# Altium PCB PCB1.pcbdoc
Units mil, origin at the board's own origin, x right, y up, seen from the top; angles counter-clockwise.
Board outline 2288.65 x 3343.6 mil, 2 copper layers (Top Layer, Bottom Layer); 10 components, 5 nets, 25 pads, 0 vias.
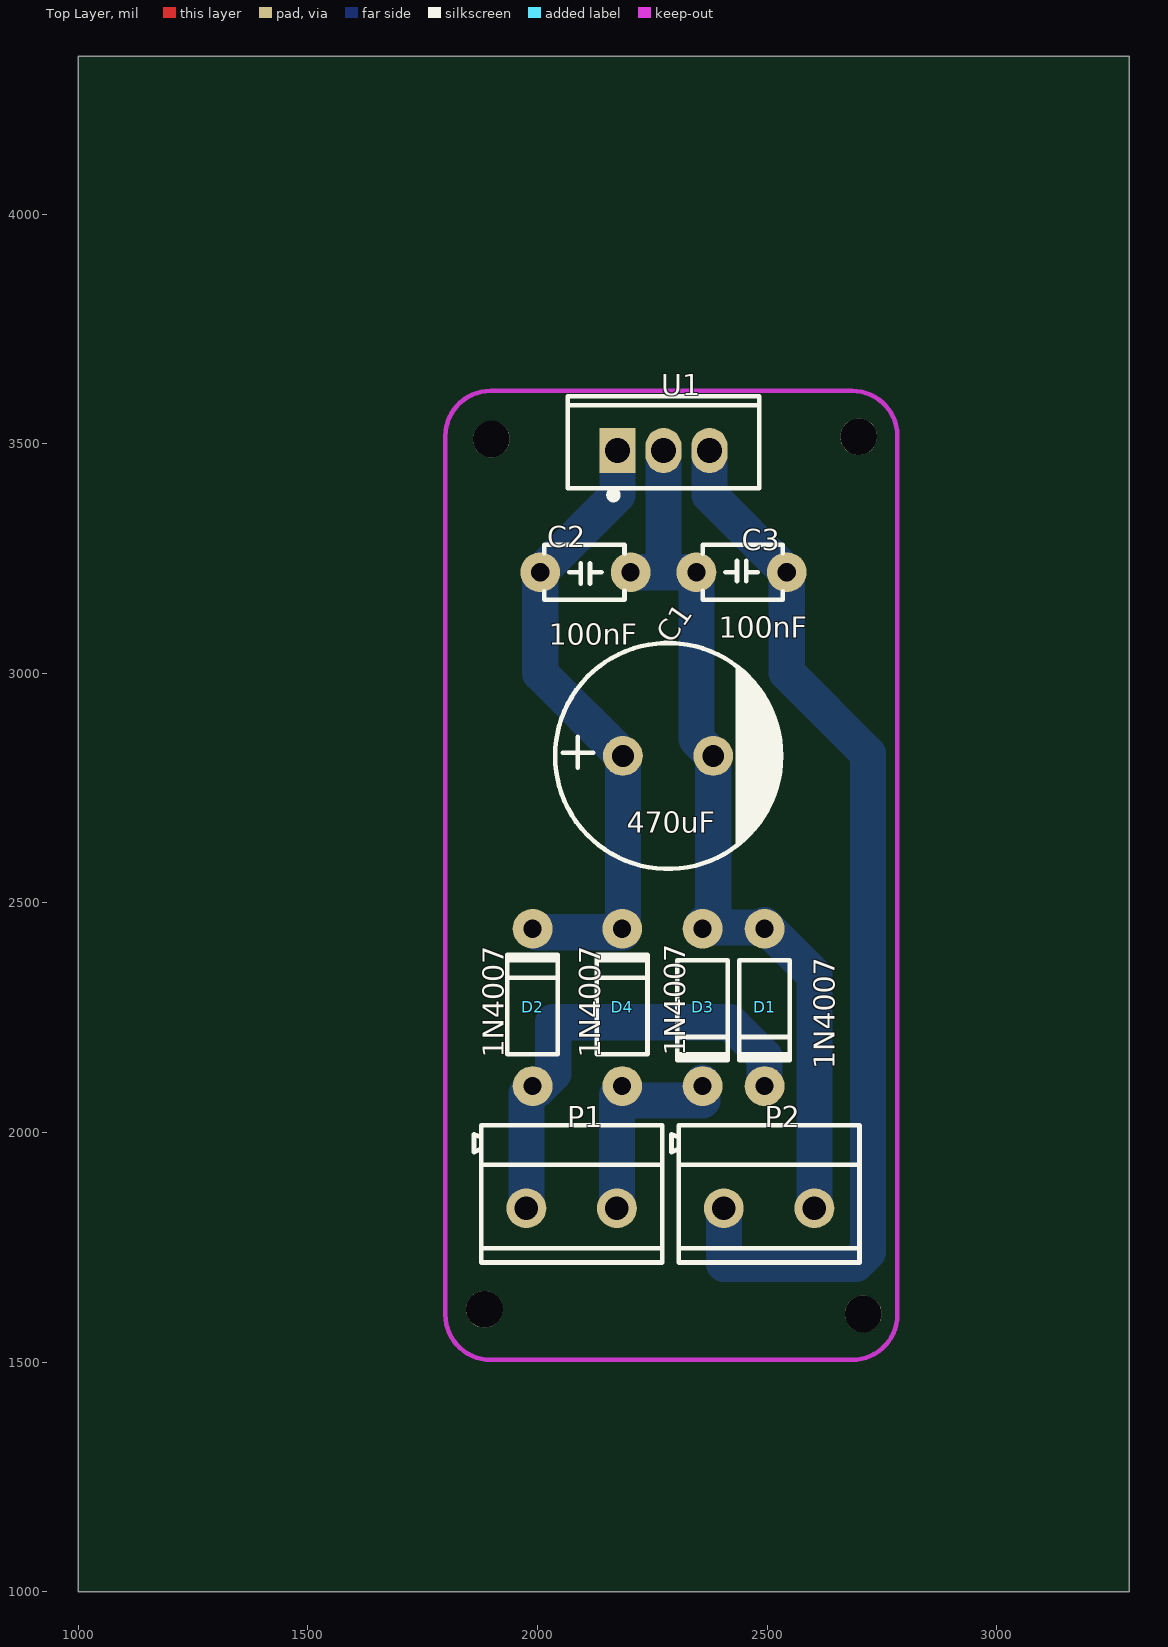
[diagram p0: Top Layer view]
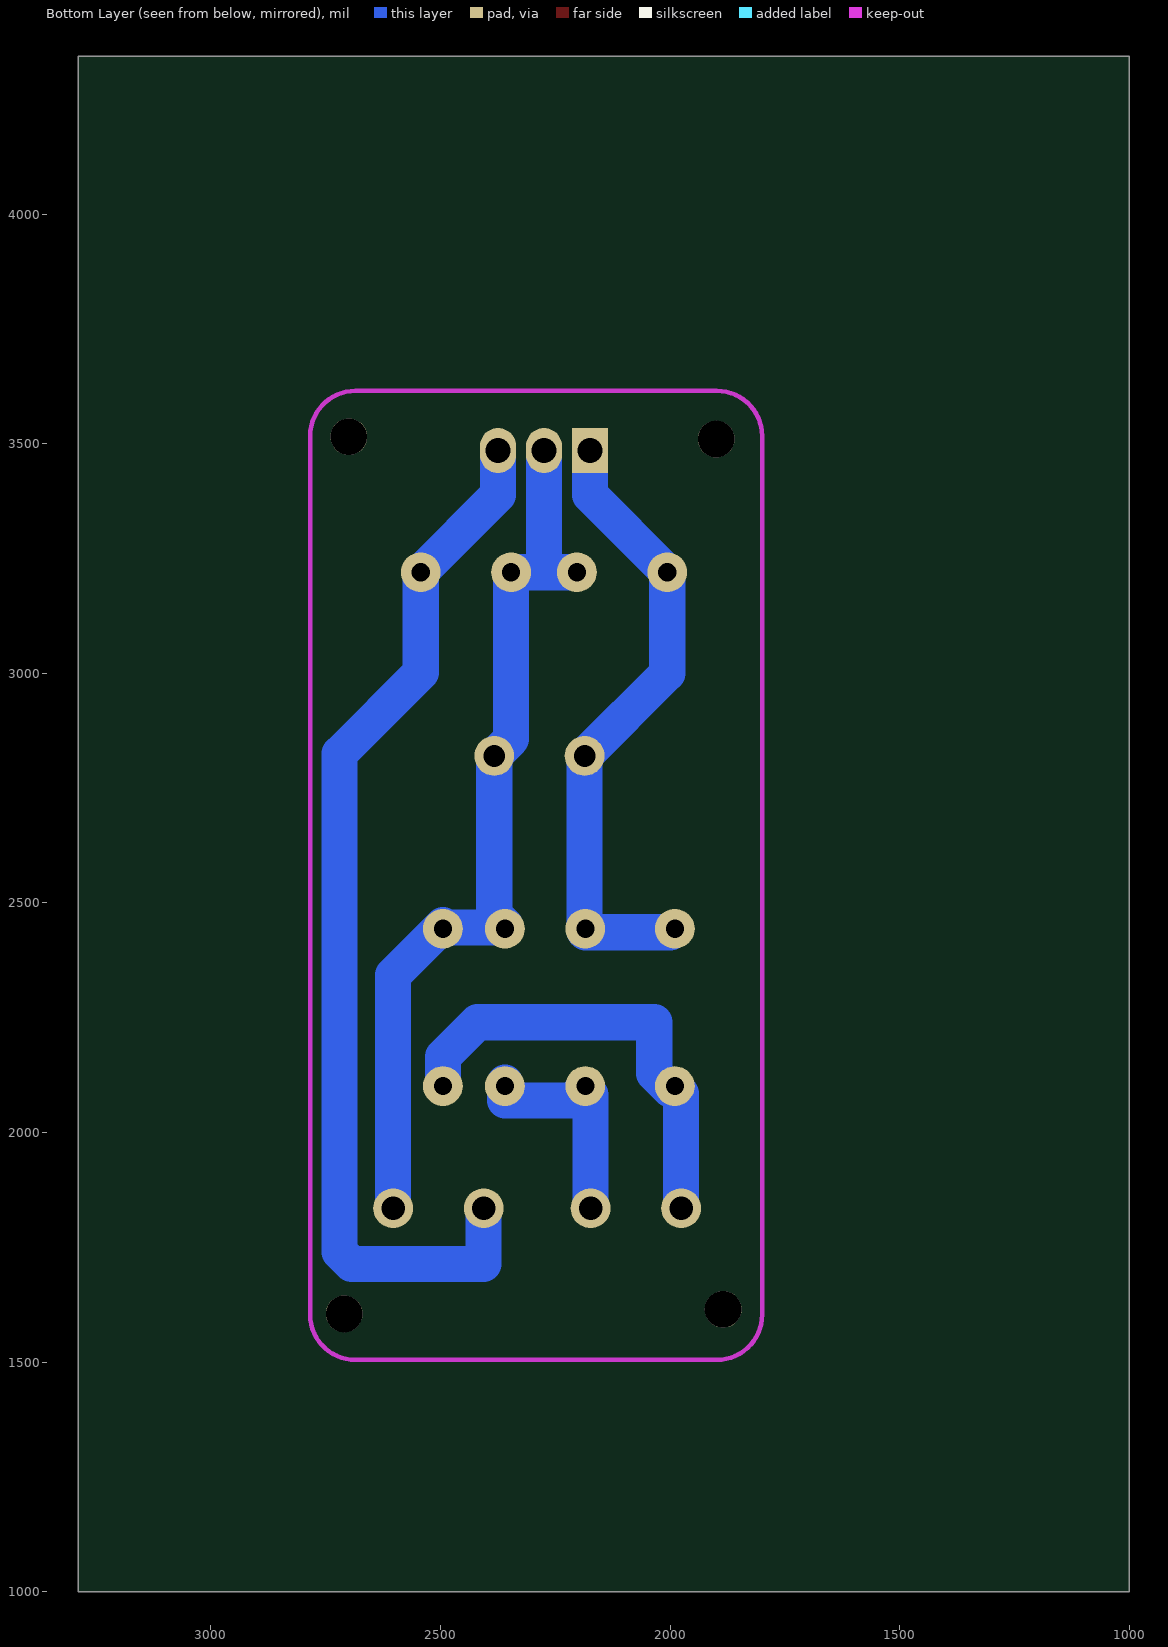
[diagram p1: Bottom Layer view, seen from below]

## Layer stack, top to bottom
Top Solder: solder mask 0.4, Solder Resist, Dk 3.5
Top Layer: signal copper 1.4
Dielectric1: dielectric 12.6, FR-4, Dk 4.8
Bottom Layer: signal copper 1.4
Bottom Solder: solder mask 0.4, Solder Resist, Dk 3.5

## Board outline
3288.65,1000 1000,1000 1000,4343.6 3288.65,4343.6

## Design rules (kind name [scope] priority, off if disabled: settings)
Clearance [All] p1: gap=10 ignorepadtopadclearanceinfootprint=FALSE
PolygonConnect [All] p1: connectstyle=Relief reliefconductorwidth=10 reliefentries=4 polygonreliefangle="90 Angle" airgapwidth=10
RoutingVias [All] p1: holewidth=28 width=50 viastyle="Through Hole" minholewidth=28 minwidth=50 maxholewidth=28 maxwidth=50
SolderMaskExpansion [All] p1: expansion=0 istentingtop=FALSE
Width [All] p1: maxlimit=10 minlimit=10 preferedwidth=10
30 further rules are at their usual default settings.

## Components (designator, comment, footprint, x,y, rotation, side; value= is the part's Value field where it differs from the comment)
C1 "470uF" CAP-TH_BD12.5-P5.00-D0.6-FD 2284.44,2820 r0 top
C2 "100nF" CAP-TH_L4.5-W3.0-P5.00-D0.5 2104.44,3220 r180 top
C3 "100nF" CAP-TH_L4.5-W3.0-P5.00-D0.5 2444.44,3220 r0 top
D1 "1N4007" DO-41_BD2.4-L4.7-P8.70-D0.6-RD 2494.44,2272.5 r90 top
D2 "1N4007" DO-41_BD2.4-L4.7-P8.70-D0.6-RD 1989.44,2272.5 r270 top
D3 "1N4007" DO-41_BD2.4-L4.7-P8.70-D0.6-RD 2359.44,2272.5 r90 top
D4 "1N4007" DO-41_BD2.4-L4.7-P8.70-D0.6-RD 2184.44,2272.5 r270 top
P1 "AC input" CONN-TH_2P-P5.00 2074.44,1835 r0 top
P2 "5v out" CONN-TH_2P-P5.00 2504.44,1835 r0 top
U1 "LM7805L-TF3-T" TO-220F-3_L10.2-W4.9-P2.54-L 2274.44,3485 r0 top

## Footprints (in the part's own frame and the unit in brackets; to place one, negate y for a bottom-side part, rotate by r counter-clockwise, add the part's x,y. Pads: shape width x height; smd on the part's side, far side on the other; paste and mask are expansions set on the pad)
CAP-TH_BD12.5-P5.00-D0.6-FD [mm]
  round 2.2 hole 1.2 paste-2539.97 mask+0.05: 1(-2.5,0) 2(2.5,0)
  silkscreen extent -6.25,-6.25 6.25,6.25
CAP-TH_L4.5-W3.0-P5.00-D0.5 [mm]
  round 2.2 hole 1 paste-2539.97 mask+0.05: 1(-2.5,0) 2(2.5,0)
  silkscreen extent -2.16,-1.52 2.29,1.52
CONN-TH_2P-P5.00 [mm]
  round 2.2 hole 1.3 paste-2539.97 mask+0.051: 1(-2.504,0) 2(2.504,0)
  silkscreen extent -5.4,-3 5,4.6
DO-41_BD2.4-L4.7-P8.70-D0.6-RD [mm]
  round 2.2 hole 1 paste-2539.97 mask+0.051: 1(-4.35,0) 2(4.35,0)
  silkscreen extent -2.92,-1.4 2.6,1.4
TO-220F-3_L10.2-W4.9-P2.54-L [mm]
  rect 2x2.5 hole 1.4 paste-2539.97 mask+0.051: 1(-2.54,0)
  oval 2x2.5 hole 1.4 paste-2539.97 mask+0.051: 2(0,0) 3(2.54,0)
  silkscreen extent -5.3,-2.66 5.3,3

## Free pads (board coordinates)
  round 80 hole 80 unplated paste-99999: ""(1884.44,1615) ""(1899.44,3510) ""(2699.44,3515) ""(2709.44,1605)

## Nets (pads, with @x,y where several pads share a name; then routed paths per layer and width w, separated by ;. In a path a pad name is that pad's centre, name@x,y a point inside that pad or via, vN(x,y) a via of type N, cw(c..) or ccw(c..) an arc to the next point about the centre after c; other vN are vias at no path point)
D1_1: D1.1 D2.2 P1.1 | length 977.5
  Bottom Layer w78.74: P1.1 1975.85,2085.14 D2.2@1989.44,2098.74 ; D2.2@1999.44,2093.74 2034.44,2128.74 2034.44,2240 2419.44,2240 2494.44,2165 D1.1@2494.44,2108.74
D1_2: C1.2 C2.1 C3.1 D1.2 D3.2 P2.2 U1.2 | length 2053
  Bottom Layer w78.74: U1.2 2274.44,3235 2259.44,3220 2202.84,3220 C3.1 2346.03,2856.84 C1.2 2382.86,2474.68 D3.2@2359.44,2451.26 ; D3.2@2369.44,2446.26 2489.44,2446.26 2494.44,2451.26 2603.04,2342.66 P2.2
D2_1: C1.1 C2.2 D2.1 D4.1 U1.1 | length 1378.7
  Bottom Layer w78.74: D2.1@1999.44,2436.26 2184.44,2436.26 2186.03,2437.84 C1.1 ; C2.2 2174.44,3388.42 U1.1 ; C2.2 2006.03,3000 C1.1
D3_1: D3.1 D4.2 P1.2 | length 475
  Bottom Layer w78.74: P1.2 2173.04,2082.34 D4.2@2184.44,2093.74 ; D4.2@2194.44,2088.74 2213.18,2070 2359.44,2070 D3.1@2359.44,2108.74
P2_1: C3.2 P2.1 U1.3 | length 2333.8
  Bottom Layer w78.74: U1.3 2374.44,3388.42 C3.2 2542.86,3001.58 2719.44,2825 2719.44,1740 2693.05,1713.6 2405.84,1713.6 P2.1

## Keep-outs
Keep-Out Layer:
  lines w10: 1799.44,1603.42 ccw(c1897.87,1603.42) 1897.87,1505 ; 1799.44,3516.57 cw(c1897.87,3516.57) 1897.87,3615 ; 2685.23,1505 ccw(c2685.23,1603.42) 2783.65,1603.42 ; 2685.23,3615 cw(c2685.23,3516.57) 2783.65,3516.57